# Altium PCB Display-Interface-v1.0.PcbDoc
Units mm, origin at the board's own origin, x right, y up, seen from the top; angles counter-clockwise.
Board outline 31.32 x 29.81 mm, 2 copper layers (Top Layer, Bottom Layer), stack 1.448 mm thick; 18 components, 22 nets, 107 pads, 35 vias.
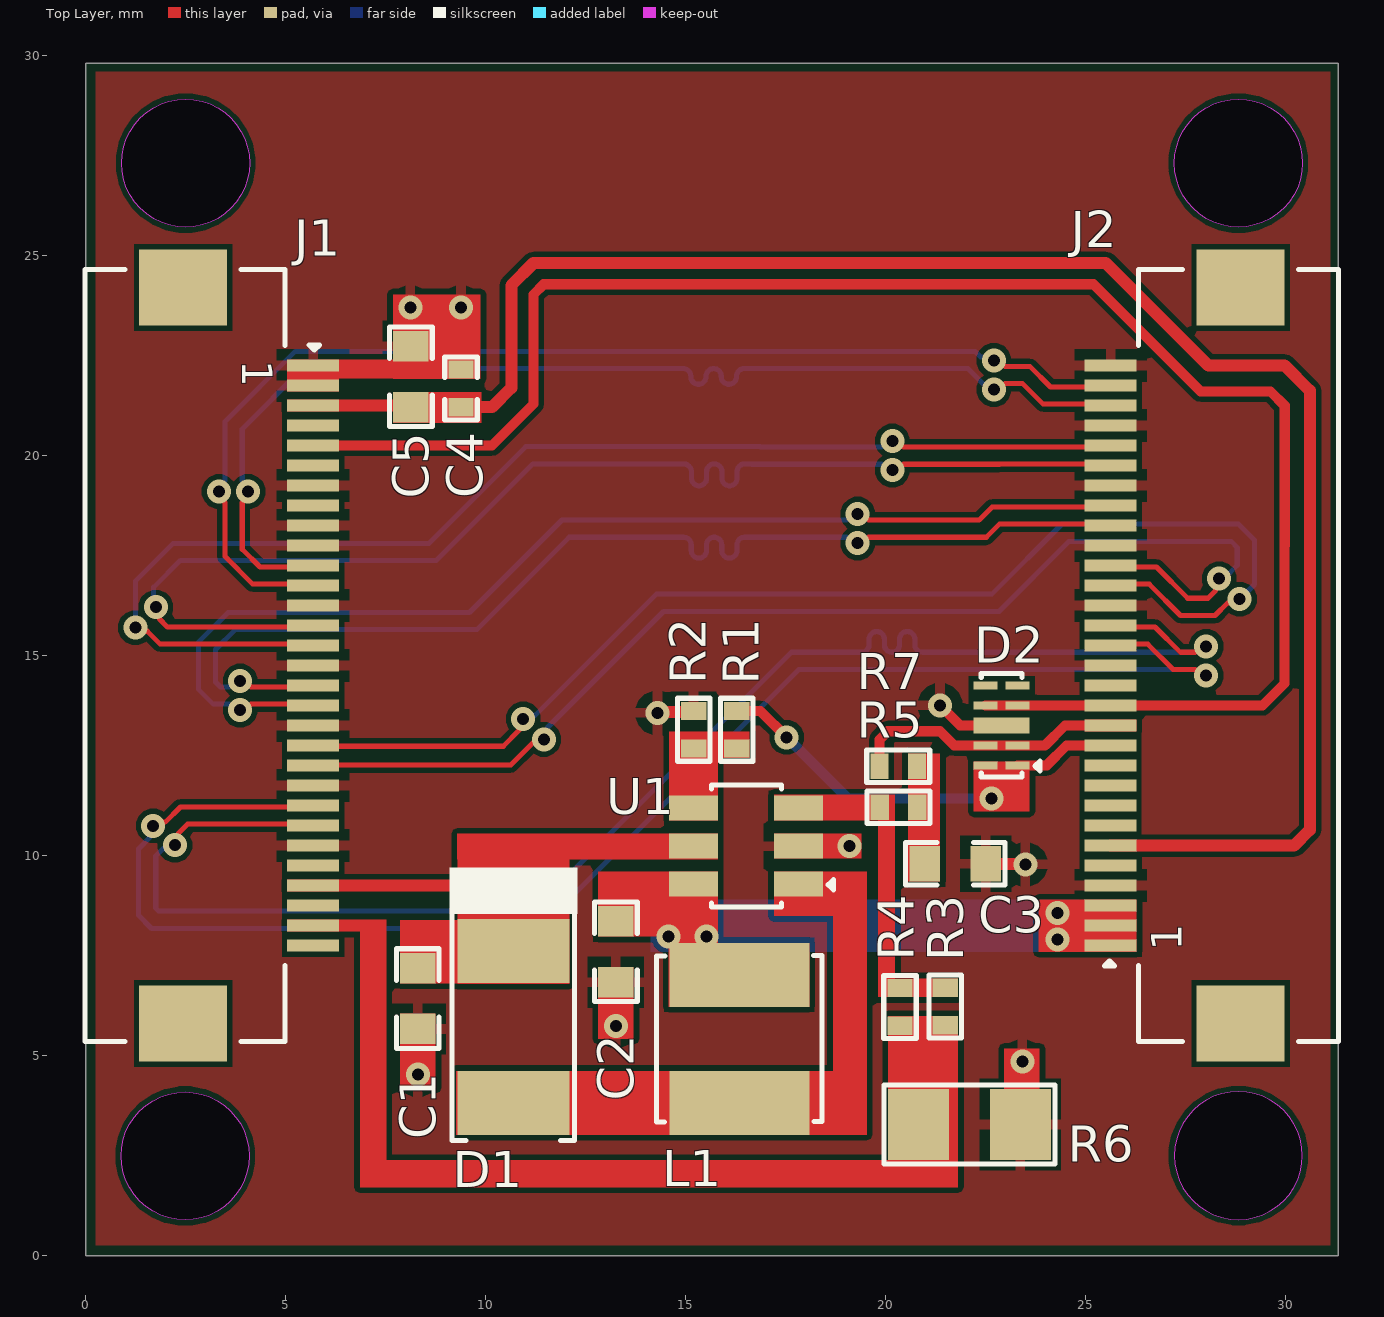
[diagram p0: Top Layer view]
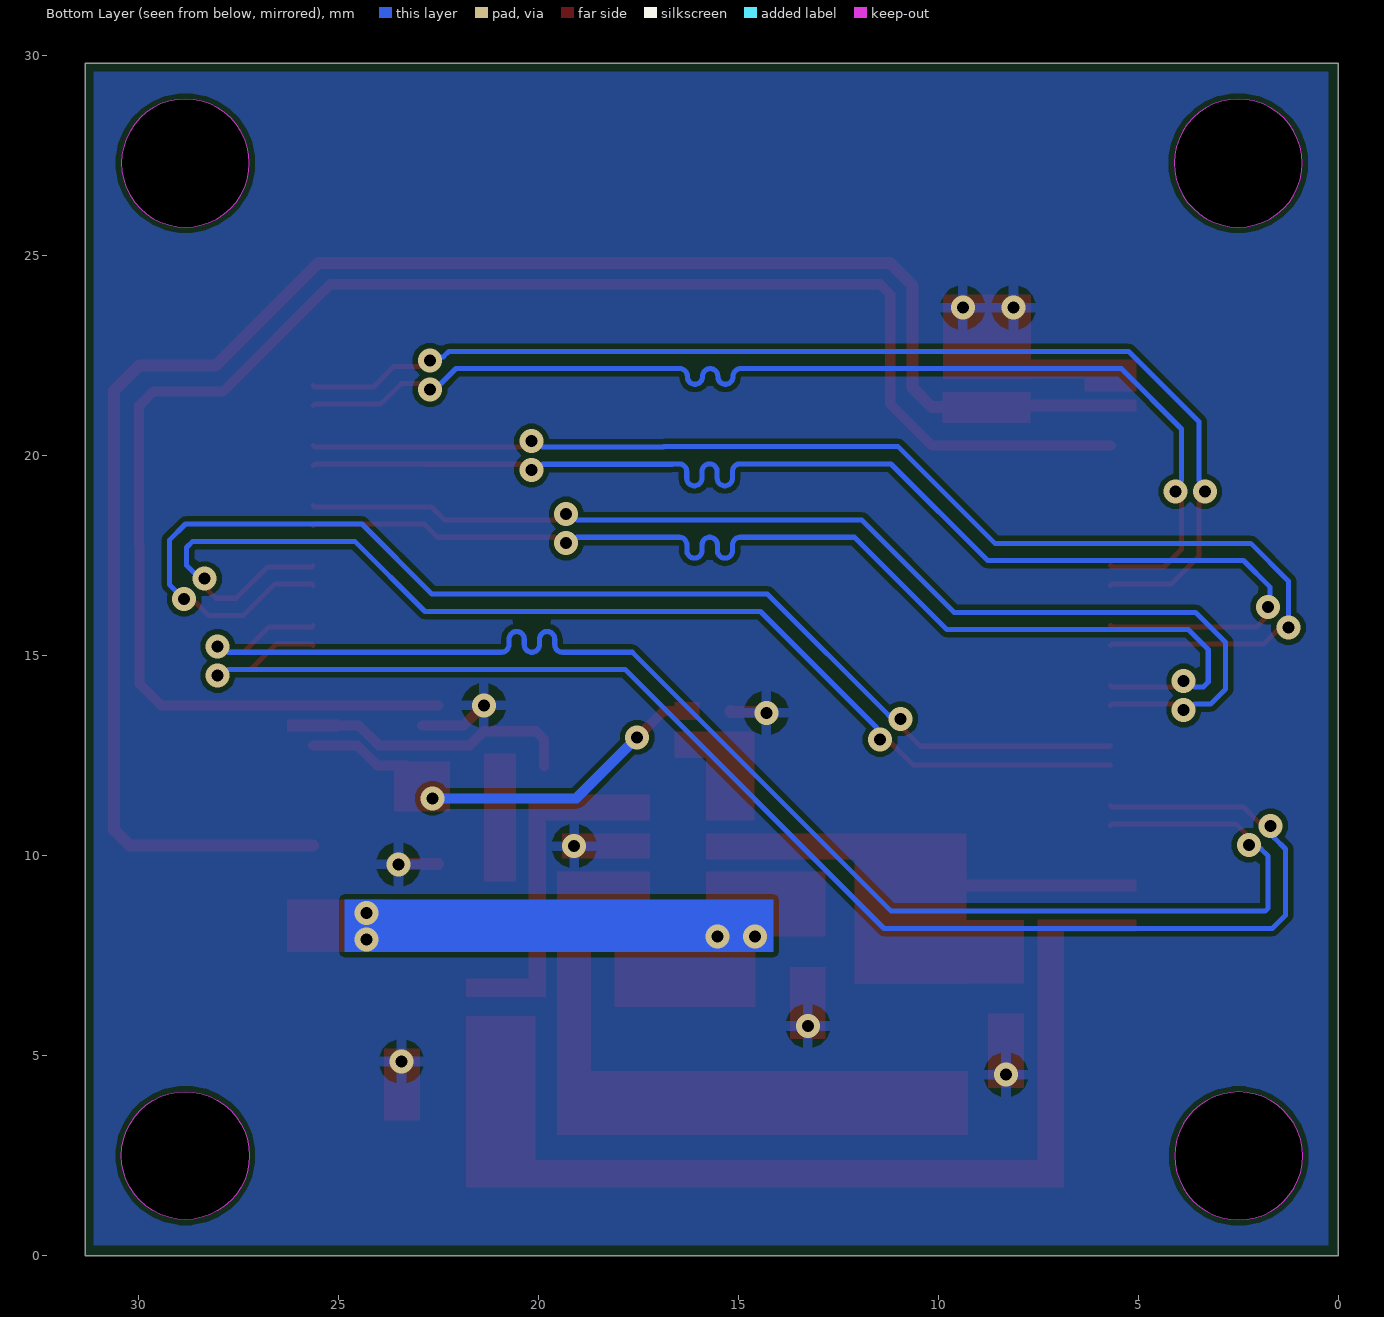
[diagram p1: Bottom Layer view, seen from below]
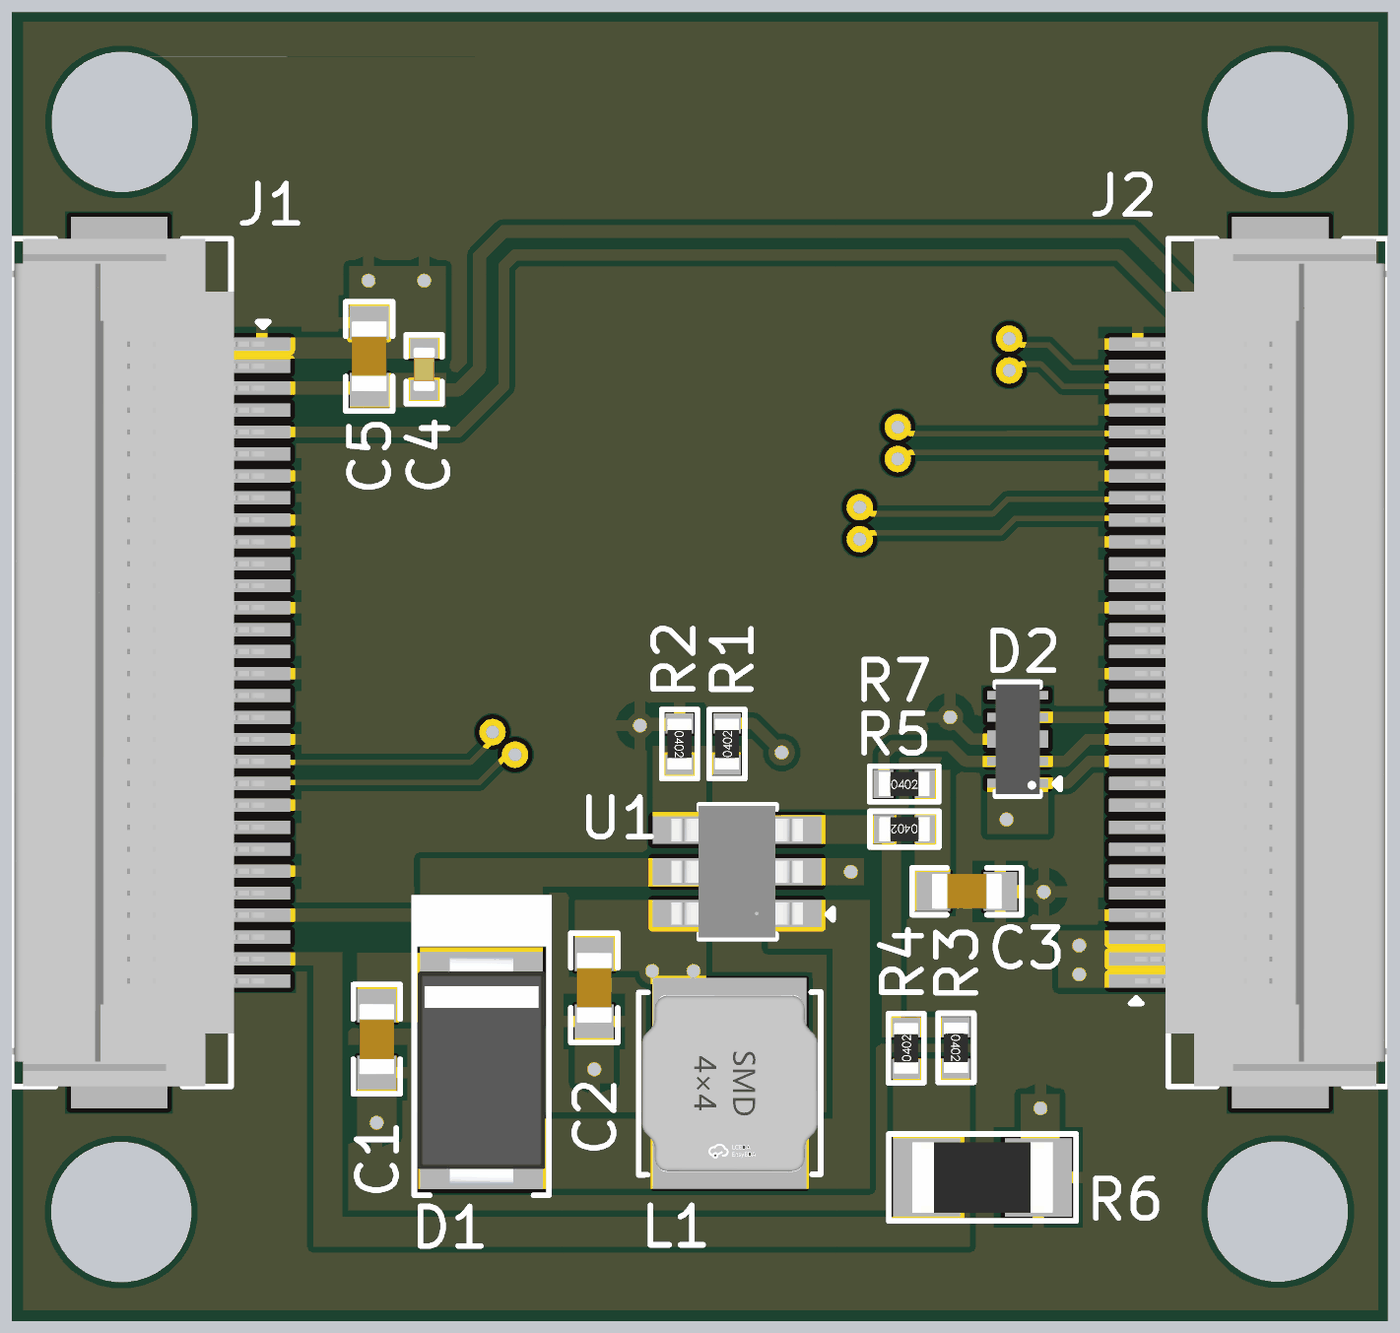
[diagram p2: 3D render of the assembled board from above, using the file's embedded part models]

## Layer stack, top to bottom
Top Solder: solder mask 0.0762, Solder Resist, Dk 3.5
Top Layer: signal copper 0.254
Dielectric 1: dielectric 0.9398, FR-4, Dk 4.8
Bottom Layer: signal copper 0.254
Bottom Solder: solder mask 0.0762, Solder Resist, Dk 3.5

## Board outline
0,0 0,29.811 31.321,29.811 31.321,0
cut-out: 2.5,25.711 cw(c2.5,27.311) 0.9,27.311 cw(c2.5,27.311) 2.5,28.911 cw(c2.5,27.311) 4.1,27.311 cw(c2.5,27.311)
cut-out: 28.821,25.711 cw(c28.821,27.311) 27.221,27.311 cw(c28.821,27.311) 28.821,28.911 cw(c28.821,27.311) 30.421,27.311 cw(c28.821,27.311)
cut-out: 27.221,2.5 ccw(c28.821,2.5) 28.821,0.9 ccw(c28.821,2.5) 30.421,2.5 ccw(c28.821,2.5) 28.821,4.1 ccw(c28.821,2.5)
cut-out: 2.489,0.889 cw(c2.489,2.489) 0.889,2.489 cw(c2.489,2.489) 2.489,4.089 cw(c2.489,2.489) 4.089,2.489 cw(c2.489,2.489)

## Design rules (kind name [scope] priority, off if disabled: settings)
Clearance [All] p1: gap=0.127 ignorepadtopadclearanceinfootprint=FALSE
DiffPairsRouting [InDifferentialPairClass('MIPI_DSI_Lines')] p1: maxlimit=0.305 minlimit=0.305 mostfreqgap=0.305 toplayer_minwidth=0.127 toplayer_maxwidth=0.127 toplayer_prefwidth=0.127 bottomlayer_minwidth=0.127 bottomlayer_maxwidth=0.127 bottomlayer_prefwidth=0.127 impedanceprofiledriven=TRUE impedanceprofileid={C3C8DDCF-617E-46B9-8DE7-2A19607A9E5E} impedanceprofilevalue=100.000000 maxuncoupledlength=12.7
HoleToHoleClearance [All] p1: gap=0.127 allowstackedmicrovias=TRUE
MaxMinImpedance "Schematic Impedance Constraint" [InNetClass('MIPI_DSI')] p1: minimum=98.00 maximum=102.0
MinimumSolderMaskSliver [All] p1: minsoldermaskwidth=0
PolygonConnect [All] p1: connectstyle=Relief reliefconductorwidth=0.254 reliefentries=4 polygonreliefangle="90 Angle" airgapwidth=0.254
RoutingVias [All] p1: holewidth=0.3 width=0.6 viastyle="Through Hole" minholewidth=0.3 minwidth=0.6 maxholewidth=0.3 maxwidth=0.6
SilkToSilkClearance [All] p1: silktosilkclearance=0.127
SilkToSolderMaskClearance [IsPad] p1: minsilkscreentomaskgap=0 clearancetoexposedcopper=TRUE
SolderMaskExpansion [All] p1: expansion=0.102 istentingtop=FALSE
Width [All] p1: maxlimit=0.5 minlimit=0.254 preferedwidth=0.254
25 further rules are at their usual default settings.

## Classes and differential pairs
differential pair class MIPI_DSI_Lines: MIPI_DSI_TX0_CLK MIPI_DSI_TX0_D0 MIPI_DSI_TX0_D1 MIPI_DSI_TX0_D2 MIPI_DSI_TX0_D3
net class MIPI_DSI: MIPI_DSI_TX0_CLK_N MIPI_DSI_TX0_CLK_P MIPI_DSI_TX0_D0_N MIPI_DSI_TX0_D0_P MIPI_DSI_TX0_D1_N MIPI_DSI_TX0_D1_P MIPI_DSI_TX0_D2_N MIPI_DSI_TX0_D2_P MIPI_DSI_TX0_D3_N MIPI_DSI_TX0_D3_P
differential pair MIPI_DSI_TX0_D3: +MIPI_DSI_TX0_D3_P -MIPI_DSI_TX0_D3_N
differential pair MIPI_DSI_TX0_D2: +MIPI_DSI_TX0_D2_P -MIPI_DSI_TX0_D2_N
differential pair MIPI_DSI_TX0_D1: +MIPI_DSI_TX0_D1_P -MIPI_DSI_TX0_D1_N
differential pair MIPI_DSI_TX0_D0: +MIPI_DSI_TX0_D0_P -MIPI_DSI_TX0_D0_N
differential pair MIPI_DSI_TX0_CLK: +MIPI_DSI_TX0_CLK_P -MIPI_DSI_TX0_CLK_N

## Components (designator, comment, footprint, x,y, rotation, side; value= is the part's Value field where it differs from the comment)
C1 "1uF" Cap-0603 8.306,6.426 r90 top
C2 "2.2uF" CAP-0603 13.259,7.595 r90 top
C3 "1uF" Cap-0603 21.742,9.792 r180 top
C4 "0.1uF" Cap-0402 9.385,21.679 r270 top
C5 "10uF" Cap-0603 8.133,21.974 r270 top
D1 "SS26" SMA(DO-214AC) 10.693,5.715 r270 top
D2 "ESD5304D-10/TR" DFN2510-10L_ 23.3,12.255 r180 top
J1 "TF31-30S-0.5SH(800)" TF31-30S-0.5SH(800) 4.064,15 r270 top locked
J2 "TF31-30S-0.5SH(800)" TF31-30S-0.5SH(800) 27.254,15 r90 top locked
L1 "22uH" YNR4018-220M 16.343,5.418 r270 top
R1 "0R" Res-0402 16.281,13.144 r90 top
R2 "10K" Res-0402 15.2,13.144 r270 top
R3 "DNP" Res-0402 21.494,6.229 r270 top
R4 "10K" Res-0402 20.36,6.218 r90 top
R5 "3K" Res-0402 20.322,11.207 r180 top value=3kR
R6 "8.2R" Res-1206 22.098,3.277 r180 top
R7 "82K" Res-0402 20.317,12.236 r0 top value=82kR
U1 "RT9293BGJ6" SOT-23-6 16.51,10.236 r180 top

## Footprints (in the part's own frame and the unit in brackets; to place one, negate y for a bottom-side part, rotate by r counter-clockwise, add the part's x,y. Pads: shape width x height; smd on the part's side, far side on the other; paste and mask are expansions set on the pad)
Cap-0402 [mil]
  rect 18x25 smd mask+2.36: 1(-18.5,0) 2(18.5,0)
  silkscreen extent -31,-16 31,16, body extent -20,-10 20,10, height 19
Cap-0603 [mil]
  rect 30x35 smd mask+2.36: 1(-30,0) 2(30,0)
  silkscreen extent -49,-21 49,21, body extent -32,-16 31,16, height 34
CAP-0603 [mil]
  rect 30x35 smd mask+2.36: 1(-30,0) 2(30,0)
  silkscreen extent -49,-21 49,21, body extent -32,-16 31,16, height 34
DFN2510-10L_ [mm]
  rect 0.6x0.2 smd: 1(0,0) 2(0,-0.5) 4(0,-1.5) 5(0,-2) 6(0.8,-2) 7(0.8,-1.5) 9(0.8,-0.5) 10(0.8,0)
  rect 1.4x0.4 smd: 3_8(0.4,-1)
  silkscreen extent -0.57,-2.3 0.91,0.3, body extent -0.1,-2.25 0.9,0.25, height 0.55
Res-0402 [mil]
  rect 18x25 smd mask+2.17: 1(-18.5,0) 2(18.5,0)
  silkscreen extent -32,-17 32,16, body extent -23,-11 23,11, height 16
Res-1206 [mil]
  rect 60x70 smd: 1(-50,0) 2(50,0)
  silkscreen extent -84,-39 84,39, body extent -63,-31 63,31, height 24
SMA(DO-214AC) [mm]
  rect 1.6x2.8 smd: 1(-1.9,0) 2(1.9,0)
  silkscreen extent -3.99,-1.6 2.84,1.6, body extent -2.6,-1.45 2.6,1.45, height 2.3
SOT-23-6 [mm]
  rect 1.22x0.62 smd: 1(-1.31,0.95) 2(-1.31,0) 3(-1.31,-0.95) 4(1.31,-0.95) 5(1.31,0) 6(1.31,0.95)
  silkscreen extent -2.18,-1.52 0.86,1.52, body extent -1.5,-1.5 1.5,1.5, height 1.47
TF31-30S-0.5SH(800) [mm]
  rect 0.3x1.3 smd: 1(-7.25,1.625) 2(-6.75,1.625) 3(-6.25,1.625) 4(-5.75,1.625) 5(-5.25,1.625) 6(-4.75,1.625) 7(-4.25,1.625) 8(-3.75,1.625) 9(-3.25,1.625) 10(-2.75,1.625) 11(-2.25,1.625) 12(-1.75,1.625) 13(-1.25,1.625) 14(-0.75,1.625) 15(-0.25,1.625) 16(0.25,1.625) 17(0.75,1.625) 18(1.25,1.625) 19(1.75,1.625) 20(2.25,1.625) 21(2.75,1.625) 22(3.25,1.625) 23(3.75,1.625) 24(4.25,1.625) 25(4.75,1.625) 26(5.25,1.625) 27(5.75,1.625) 28(6.25,1.625) 29(6.75,1.625) 30(7.25,1.625)
  rect 1.9x2.2 smd: S1(9.2,-1.625) S2(-9.2,-1.625)
  silkscreen extent -9.65,-4.08 9.65,1.78, body extent -9.65,-4.06 9.65,1.69, height 2.02
YNR4018-220M [mm]
  rect 1.6x3.5 smd paste+0 mask+0.051: 1(-1.6,0) 2(1.6,0)
  silkscreen extent -2.08,-2.07 2.08,2.07, body extent -2.01,-2 2.01,2, height 1.87

## Part data
C1 C3: library part CL10A105KB8NNNC, "CAP CER 1UF 50V X5R 0603", Case Code (Imperial)=0603, Case Code (Metric)=1608, Dielectric=X5R, LCSC Part Number=C15849, Manufacturer=Samsung, Max Operating Temperature=85°C, Min Operating Temperature=-55°C, Tolerance=10%, Voltage Rating=50V, Case/Package=0603, Category="Ceramic Capacitors", ComponentLink1Description=https://datasheet.ciiva.com/26877/getdatasheetpartid-753736-26877879.pdf?src-supplier=Verical, ComponentLink1URL=https://datasheet.ciiva.com/26877/getdatasheetpartid-753736-26877879.pdf?src-supplier=Verical, Depth=0.8mm, Item Type=Capacitor, Length=1.6mm, Manufacturer Part Number=CL10A105KB8NNNC, Material=4241ConductorMaterial, Mounting Technology="Surface Mount", Packaging="Tape and Reel", Pricing="4000=0.01632, 8000=0.01595, 16000=0.01557, 24000=0.0152, 32000=0.01482 (USD)", Radiation Hardening=No, RoHS=Yes, RoHS Compliant=Yes, Series=CL, Stock=780446, Supplier=Avnet, Supplier Part Number=CL10A105KB8NNNC, Voltage Rating (DC)=50V
C2: library part CC0603KRX5R8BB225, "CAP CER 2.2UF 25V X5R 0603", Case Code (Imperial)=0603, Case Code (Metric)=1608, Dielectric=X5R, LCSC Part Number=C309478, Manufacturer=Yageo, Max Operating Temperature=85°C, Min Operating Temperature=-55°C, Package Quantity=4000, Resistor Type=Ceramic, Supplier Part Number 1=311-1786-1-ND, Tolerance=10%, Voltage Rating=25V, Capacitance=2.2uF, Case/Package=0603, ComponentLink1Description=https://www.verical.com/server-webapp/html/getDatasheet?partID=782757&src-supplier=Verical, ComponentLink1URL=https://www.verical.com/server-webapp/html/getDatasheet?partID=782757&src-supplier=Verical, Depth=0.8mm, Halogen Free="Halogen Free", Item Type=Capacitor, Lead Free="Lead Free", Length=1.6mm, Manufacturer Part Number=CC0603KRX5R8BB225, Mount="Surface Mount", Packaging="Tape and Reel", Pricing 1="1=0.4, 10=0.276, 50=0.1932, 100=0.1656, 500=0.1242, 1000=0.10488 (USD)", Radiation Hardening=No, RoHS Compliant=Yes, Stock 1=687936, Supplier 1=Digi-Key, Termination=SMD/SMT, Thickness=0.037inch, Voltage Rating (DC)=25V, Weight=7.1E-05oz, Width=0.031inch
C4: library part CC0402KRX5R6BB104, "CAP CER 0.1UF 10V X5R 0402", Capacitance=100nF, Case Code (Imperial)=0402, Case Code (Metric)=1005, Dielectric=X5R, Insulation Resistance=10GR, LCSC Part Number=C129131, Manufacturer=Yageo, Max Operating Temperature=85°C, Min Operating Temperature=-55°C, Package Quantity=1, Supplier Part Number 1=311-1336-1-ND, Tolerance=10%, Voltage Rating=10V, Case/Package=0402, Category="Ceramic Capacitors", ComponentLink1Description=https://datasheet.ciiva.com/144/mlccorderingcode-144029.pdf?src-supplier=Digi-Key, ComponentLink1URL=https://datasheet.ciiva.com/144/mlccorderingcode-144029.pdf?src-supplier=Digi-Key, ComponentLink2Description=https://datasheet.ciiva.com/144/mlccorderingcode-144028.pdf?src-supplier=Digi-Key, ComponentLink2URL=https://datasheet.ciiva.com/144/mlccorderingcode-144028.pdf?src-supplier=Digi-Key, ComponentLink3Description=https://datasheet.ciiva.com/144/mlccorderingcode-144030.pdf?src-supplier=Digi-Key, ComponentLink3URL=https://datasheet.ciiva.com/144/mlccorderingcode-144030.pdf?src-supplier=Digi-Key, ComponentLink4Description=https://datasheet.ciiva.com/7978/1359354-7978091.pdf?src-supplier=Element14, ComponentLink4URL=https://datasheet.ciiva.com/7978/1359354-7978091.pdf?src-supplier=Element14, ComponentLink5Description=https://datasheet.ciiva.com/11587/upy-gphc-x5r-4v-to-50v-12-11587302.pdf?src-supplier=Avnet, ComponentLink5URL=https://datasheet.ciiva.com/11587/upy-gphc-x5r-4v-to-50v-12-11587302.pdf?src-supplier=Avnet, Depth=0.5mm, Dissipation Factor=5%, Halogen Free="Halogen Free", Height=0.5mm, Item Type=Capacitor, Lead Free="Lead Free", Length=1mm, Manufacturer Part Number=CC0402KRX5R6BB104, Mount="Surface Mount", Number of Pins=2, Packaging="Tape and Reel", Pricing 1="1=0.10000, 10=0.02700, 50=0.01500, 100=0.01220, 500=0.00874, 1000=0.00687, 2500=0.00625, 5000=0.00575 (USD)", Radiation Hardening=No, REACH SVHC="No SVHC", RoHS=Yes, RoHS Compliant=Yes, Series=CC, Stock 1=6385580, Supplier 1=Digi-Key, Termination=SMD/SMT, Thickness=0.022inch, Voltage Rating (DC)=10V, Width=0.02inch
C5: library part GRM188R60J106ME47D, "CAP CER 10UF 6.3V X5R 0603", Case Code (Imperial)=0603, Case Code (Metric)=1608, Dielectric=X5R, LCSC Part Number=C77041, Manufacturer=Murata, Max Operating Temperature=85°C, Min Operating Temperature=-55°C, Package Quantity=4000, Tolerance=20%, Voltage=6.3V, Capacitance=10uF, Case/Package=0603, Category="Ceramic Capacitors", ComponentLink1Description=https://datasheet.ciiva.com/22776/1747457-22776418.pdf?src-supplier=Farnell, ComponentLink1URL=https://datasheet.ciiva.com/22776/1747457-22776418.pdf?src-supplier=Farnell, ComponentLink2Description=https://datasheet.ciiva.com/28584/415295-28584232.pdf?src-supplier=Element14, ComponentLink2URL=https://datasheet.ciiva.com/28584/415295-28584232.pdf?src-supplier=Element14, ComponentLink3Description=https://datasheet.ciiva.com/3777/10175grm188r60j106me4723-3777268.pdf?src-supplier=Arrow+Electronics, ComponentLink3URL=https://datasheet.ciiva.com/3777/10175grm188r60j106me4723-3777268.pdf?src-supplier=Arrow+Electronics, ComponentLink4Description=https://datasheet.ciiva.com/29202/450781-da-01-de-vs-chip-kond-0603-10-0-uf-20pr-6-3v-x5r-29202806.pdf?src-supplier=Conrad, ComponentLink4URL=https://datasheet.ciiva.com/29202/450781-da-01-de-vs-chip-kond-0603-10-0-uf-20pr-6-3v-x5r-29202806.pdf?src-supplier=Conrad, ComponentLink5Description=https://datasheet.ciiva.com/29199/454401-da-01-en-vs-kondensator-0603-29199677.pdf?src-supplier=Conrad, ComponentLink5URL=https://datasheet.ciiva.com/29199/454401-da-01-en-vs-kondensator-0603-29199677.pdf?src-supplier=Conrad, ComponentLink6Description=https://datasheet.ciiva.com/14116/grmseries-highdielectrictype-eng-14116428.pdf?src-supplier=Distrelec, ComponentLink6URL=https://datasheet.ciiva.com/14116/grmseries-highdielectrictype-eng-14116428.pdf?src-supplier=Distrelec, ComponentLink7Description=https://datasheet.ciiva.com/138/partnumbering-e-01-138659.pdf?src-supplier=Digi-Key, ComponentLink7URL=https://datasheet.ciiva.com/138/partnumbering-e-01-138659.pdf?src-supplier=Digi-Key, ComponentLink8Description=https://datasheet.ciiva.com/138/partnumbering-e-01-138658.pdf?src-supplier=Digi-Key, ComponentLink8URL=https://datasheet.ciiva.com/138/partnumbering-e-01-138658.pdf?src-supplier=Digi-Key, ComponentLink9Description=https://datasheet.ciiva.com/138/partnumbering-e-01-138660.pdf?src-supplier=Digi-Key, ComponentLink9URL=https://datasheet.ciiva.com/138/partnumbering-e-01-138660.pdf?src-supplier=Digi-Key, ComponentLink10Description=https://datasheet.ciiva.com/16373/l0005e-16373580.pdf?src-supplier=Future+Electronics, ComponentLink10URL=https://datasheet.ciiva.com/16373/l0005e-16373580.pdf?src-supplier=Future+Electronics, Depth=0.8mm, Height=0.8mm, Item Type=Capacitor, Lead Free="Lead Free", Length=1.6mm, Manufacturer Part Number=GRM188R60J106ME47D, Material=Ceramic, Mount="Surface Mount", Packaging="Cut Tape", Pricing 1="4000=0.02461, 8000=0.02328, 16000=0.02195, 24000=0.02062, 32000=0.01929, 40000=0.01796, 400000=0.01663 (USD)", Radiation Hardening=No, Reach SVHC Compliant=Yes, RoHS=Yes, RoHS Compliant=Yes, Series=GRM, Stock 1=513625, Supplier 1=Avnet, Supplier Part Number 1=GRM188R60J106ME47D, Termination=Standard, Thickness=0.035inch, Voltage Rating=6.3V, Voltage Rating (DC)=6.3V, Weight=0.000222oz, Width=0.8mm
D1: "60V 700mV@2A 2A SMA(DO-214AC) Schottky Barrier Diodes (SBD) ROHS", LCSC Part Number=C14238, Manufacturer=MDD, Package=SMA(DO-214AC), ComponentLink1Description=LCSC, ComponentLink1URL=https://www.lcsc.com/product-detail/Schottky-Barrier-Diodes-SBD_MDD-Microdiode-Electronics-SS26_C14238.html, Item Type=Diode, Manufacturer Part Number=SS26
D2: "4A@8/20us 12V 7V 5V Unidirectional DFN2510-10L TVS ROHS", LCSC Part Number=C153722, Manufacturer=WILLSEMI, Package=DFN2510-10L, ComponentLink1Description=LCSC, ComponentLink1URL=https://www.lcsc.com/product-detail/TVS_WILLSEMI-Will-Semicon-ESD5304D-10-TR_C153722.html, Item Type=Diode, Manufacturer Part Number=ESD5304D-10/TR
J1 J2: "CONN FFC BOTTOM 30POS 0.5MM R/A", LCSC Part Number=C5137133, Manufacturer=Hirose, Supplier Part Number=26-TF31-30S-0.5SH(800)CT-ND, ComponentLink1Description=https://www.hirose.com/product/download/?distributor=digikey&amp;type=specSheet&amp;lang=en&amp;num=TF31-30S-0.5SH(800)&src-supplier=Digikey, ComponentLink1URL=https://www.hirose.com/product/download/?distributor=digikey&amp;type=specSheet&amp;lang=en&amp;num=TF31-30S-0.5SH(800)&src-supplier=Digikey, ComponentLink2Description=https://datasheet.octopart.com/TF31-30S-0.5SH%28800%29-Hirose-datasheet-138123803.pdf?src-supplier=Sager+Electronics, ComponentLink2URL=https://datasheet.octopart.com/TF31-30S-0.5SH%28800%29-Hirose-datasheet-138123803.pdf?src-supplier=Sager+Electronics, Item Type="FFC / FPC Connector", Manufacturer Part Number=TF31-30S-0.5SH(800), Pricing="1=2.37, 10=2.065, 25=1.9772, 50=1.9332, 100=1.8453, 250=1.66952, 500=1.53772, 1000=1.31805 (USD)", RoHS=Yes, Stock=14095, Supplier=Digikey
L1: library part YNR4018-220M, "590mA 22uH ±20% SMD,4x4x1.8mm Power Inductors ROHS", LCSC Part Number=C340373, Manufacturer=YJYCOIN, Package=SMD,4x4x1.8mm, ComponentLink1Description=LCSC, ComponentLink1URL=https://www.lcsc.com/product-detail/Power-Inductors_YJYCOIN-YNR4018-220M_C340373.html, Item Type=Inductor, Manufacturer Part Number=YNR4018-220M
R1: library part RC0402FR-070RL, "RES 0 OHM JUMPER 1/16W 0402", Case Code (Imperial)=0402, Case Code (Metric)=1005, LCSC Part Number=C106231, Manufacturer=Yageo, Max Operating Temperature=155°C, Max Power Dissipation=63mW, Min Operating Temperature=-55°C, Power Rating=62.5mW, Resistor Type="Thick Film", Supplier Part Number 1=603-RC0402FR-070RL, Temperature Coefficient=200ppm/°C, Tolerance=1%, Voltage Rating=50V, Case/Package=0402, Category="Chip SMD Resistors", ComponentLink1Description=https://datasheet.ciiva.com/8896/pyu-rc0402-51-rohs-l-6-8896149.pdf?src-supplier=Avnet, ComponentLink1URL=https://datasheet.ciiva.com/8896/pyu-rc0402-51-rohs-l-6-8896149.pdf?src-supplier=Avnet, ComponentLink2Description=https://datasheet.ciiva.com/16790/pyu-rc0402-51-rohs-l-6-r-16790444.pdf?src-supplier=Future+Electronics, ComponentLink2URL=https://datasheet.ciiva.com/16790/pyu-rc0402-51-rohs-l-6-r-16790444.pdf?src-supplier=Future+Electronics, Contact Plating=Tin,Matte, Features="Moisture Resistant", Height=0.35mm, Lead Free="Lead Free", Length=1mm, Manufacturer Part Number=RC0402FR-070RL, Mount="Surface Mount", Number of Terminations=2, Packaging="Tape and Reel", Pricing 1="1=0.10000, 10=0.01400, 50=0.01400, 100=0.00600, 1000=0.00300, 5000=0.00200, 10000=0.00100 (USD)", Radiation Hardening=No, Resistance=0R, RoHS=Yes, RoHS Compliant=Yes, Series=RC, Size Code=0402, Stock 1=8556842, Supplier 1=Mouser, Termination=SMD/SMT, Width=0.5mm
R2 R4: library part RC0402FR-0710KL, "RES 10K OHM 1% 1/16W 0402", Case Code (Imperial)=0402, Case Code (Metric)=1005, LCSC Part Number=C60490, Manufacturer=Yageo, Max Operating Temperature=155°C, Max Power Dissipation=63mW, Min Operating Temperature=-55°C, Power Rating=62.5mW, Resistance=10kR, Resistance Tolerance=1%, Resistor Type="Thick Film", Supplier Part Number 1=603-RC0402FR-0710KL, Temperature Coefficient=100ppm/°C, Voltage Rating=50V, Case/Package=0402, Category="Chip SMD Resistors", ComponentLink1Description=https://datasheet.ciiva.com/7660/38568-7660787.pdf?src-supplier=Element14, ComponentLink1URL=https://datasheet.ciiva.com/7660/38568-7660787.pdf?src-supplier=Element14, ComponentLink2Description=https://datasheet.ciiva.com/7849/1686128-7849814.pdf?src-supplier=Element14, ComponentLink2URL=https://datasheet.ciiva.com/7849/1686128-7849814.pdf?src-supplier=Element14, ComponentLink3Description=https://datasheet.ciiva.com/7983/1018594-7983486.pdf?src-supplier=Element14, ComponentLink3URL=https://datasheet.ciiva.com/7983/1018594-7983486.pdf?src-supplier=Element14, ComponentLink4Description=https://datasheet.ciiva.com/22747/1018594-22747512.pdf?src-supplier=Element14, ComponentLink4URL=https://datasheet.ciiva.com/22747/1018594-22747512.pdf?src-supplier=Element14, ComponentLink5Description=https://datasheet.ciiva.com/12667/pyu-rc0402-51-rohs-l-6-r-12667067.pdf?src-supplier=Mouser, ComponentLink5URL=https://datasheet.ciiva.com/12667/pyu-rc0402-51-rohs-l-6-r-12667067.pdf?src-supplier=Mouser, ComponentLink6Description=https://datasheet.ciiva.com/7849/1784430-7849813.pdf?src-supplier=Element14, ComponentLink6URL=https://datasheet.ciiva.com/7849/1784430-7849813.pdf?src-supplier=Element14, ComponentLink7Description=https://datasheet.ciiva.com/7849/1784430-7849815.pdf?src-supplier=Element14, ComponentLink7URL=https://datasheet.ciiva.com/7849/1784430-7849815.pdf?src-supplier=Element14, Construction=Rectangular, Depth=0.5mm, Features="Moisture Resistant", Height=0.32mm, Item Type=Resistor, Lead Free="Lead Free", Lead Pitch=0.2mm, Length=1mm, Manufacturer Part Number=RC0402FR-0710KL, Military Standard=Not, Number of Pins=2, Number of Terminations=2, Packaging="Tape and Reel", Pricing 1="1=0.10000, 10=0.01400, 50=0.01400, 100=0.00500, 1000=0.00300, 10000=0.00200 (USD)", REACH SVHC="No SVHC", RoHS=Yes, RoHS Compliant=Yes, Series=RC, Stock 1=18648329, Supplier 1=Mouser, Termination=SMD/SMT, Tolerance=1%, Voltage Rating (DC)=50V, Width=0.5mm, Working Voltage=50V
R3: library part RC0402FR-070RL, "RES 0 OHM JUMPER 1/16W 0402", Case Code (Imperial)=0402, Case Code (Metric)=1005, LCSC Part Number=C106231, Manufacturer=Yageo, Max Operating Temperature=155°C, Max Power Dissipation=63mW, Min Operating Temperature=-55°C, Power Rating=62.5mW, Resistance=0R, Resistor Type="Thick Film", Supplier Part Number 1=603-RC0402FR-070RL, Temperature Coefficient=200ppm/°C, Tolerance=1%, Voltage Rating=50V, Case/Package=0402, Category="Chip SMD Resistors", ComponentLink1Description=https://datasheet.ciiva.com/8896/pyu-rc0402-51-rohs-l-6-8896149.pdf?src-supplier=Avnet, ComponentLink1URL=https://datasheet.ciiva.com/8896/pyu-rc0402-51-rohs-l-6-8896149.pdf?src-supplier=Avnet, ComponentLink2Description=https://datasheet.ciiva.com/16790/pyu-rc0402-51-rohs-l-6-r-16790444.pdf?src-supplier=Future+Electronics, ComponentLink2URL=https://datasheet.ciiva.com/16790/pyu-rc0402-51-rohs-l-6-r-16790444.pdf?src-supplier=Future+Electronics, Contact Plating=Tin,Matte, Features="Moisture Resistant", Height=0.35mm, Lead Free="Lead Free", Length=1mm, Manufacturer Part Number=RC0402FR-070RL, Mount="Surface Mount", Number of Terminations=2, Packaging="Tape and Reel", Pricing 1="1=0.10000, 10=0.01400, 50=0.01400, 100=0.00600, 1000=0.00300, 5000=0.00200, 10000=0.00100 (USD)", Radiation Hardening=No, RoHS=Yes, RoHS Compliant=Yes, Series=RC, Size Code=0402, Stock 1=8556842, Supplier 1=Mouser, Termination=SMD/SMT, Width=0.5mm
R5: library part RC0402FR-073KL, "RES 3K OHM 1% 1/16W 0402", Case Code (Imperial)=0402, Case Code (Metric)=1005, LCSC Part Number=C137987, Manufacturer=Yageo, Max Operating Temperature=155°C, Max Power Dissipation=63mW, Min Operating Temperature=-55°C, Package Quantity=1, Resistance Tolerance=1%, Resistor Type="Thick Film", Supplier Part Number=311-3KLRCT-ND, Temperature Coefficient=100ppm/°C, Voltage Rating=50V, Case/Package=0402, Category="Chip SMD Resistors", ComponentLink1Description=https://datasheet.ciiva.com/2553/pyu-r-int-thick-7-2553254.pdf?src-supplier=Digikey, ComponentLink1URL=https://datasheet.ciiva.com/2553/pyu-r-int-thick-7-2553254.pdf?src-supplier=Digikey, ComponentLink2Description=https://datasheet.ciiva.com/7849/1018594-7849992.pdf?src-supplier=Element14, ComponentLink2URL=https://datasheet.ciiva.com/7849/1018594-7849992.pdf?src-supplier=Element14, ComponentLink3Description=https://datasheet.ciiva.com/7849/1018594-7849991.pdf?src-supplier=Element14, ComponentLink3URL=https://datasheet.ciiva.com/7849/1018594-7849991.pdf?src-supplier=Element14, ComponentLink4Description=https://datasheet.ciiva.com/2553/pyu-r-int-thick-7-2553255.pdf?src-supplier=Digikey, ComponentLink4URL=https://datasheet.ciiva.com/2553/pyu-r-int-thick-7-2553255.pdf?src-supplier=Digikey, ComponentLink5Description=https://datasheet.ciiva.com/2553/pyu-r-int-thick-7-2553256.pdf?src-supplier=Digikey, ComponentLink5URL=https://datasheet.ciiva.com/2553/pyu-r-int-thick-7-2553256.pdf?src-supplier=Digikey, ComponentLink6Description=https://datasheet.ciiva.com/12666/pyu-rc0402-51-rohs-l-6-r-12666952.pdf?src-supplier=Mouser, ComponentLink6URL=https://datasheet.ciiva.com/12666/pyu-rc0402-51-rohs-l-6-r-12666952.pdf?src-supplier=Mouser, Construction=Rectangular, Depth=0.5mm, Features="Moisture Resistant", Height=0.016inch, Item Type=Resistor, Lead Free=5697LeadFree, Length=0.039inch, Manufacturer Part Number=RC0402FR-073KL, Military Standard=Not, Number of Terminations=2, Packaging="Tape and Reel", Power Rating=63mW, Pricing="1=0.1, 10=0.015, 50=0.0088, 100=0.0073, 500=0.00488, 1000=0.00417, 5000=0.00297 (USD)", Reach SVHC Compliant=Unknown, RoHS=Yes, RoHS Compliant=Yes, Series=RC, Stock=7013, Supplier=Digikey, Termination=SMD/SMT, Tolerance=1%, Voltage Rating (DC)=50V, Width=0.02inch
R6: library part RC1206FR-078R2L, "RES 8.2 OHM 1% 1/4W 1206", LCSC Part Number=C488973, Manufacturer=Yageo, Supplier Part Number=311-8.20FRCT-ND, Voltage Rating (AC)=200V, ComponentLink1Description=https://datasheet.ciiva.com/11809/0900766b80c6630a-11809543.pdf?src-supplier=Rs, ComponentLink1URL=https://datasheet.ciiva.com/11809/0900766b80c6630a-11809543.pdf?src-supplier=Rs, ComponentLink2Description=https://datasheet.ciiva.com/2460/pyu-rc1206-51-rohs-l-4-2460129.pdf?src-supplier=Digikey, ComponentLink2URL=https://datasheet.ciiva.com/2460/pyu-rc1206-51-rohs-l-4-2460129.pdf?src-supplier=Digikey, ComponentLink3Description=https://datasheet.ciiva.com/2460/pyu-rc1206-51-rohs-l-4-2460130.pdf?src-supplier=Digikey, ComponentLink3URL=https://datasheet.ciiva.com/2460/pyu-rc1206-51-rohs-l-4-2460130.pdf?src-supplier=Digikey, ComponentLink4Description=https://datasheet.ciiva.com/2460/pyu-rc1206-51-rohs-l-4-2460131.pdf?src-supplier=Digikey, ComponentLink4URL=https://datasheet.ciiva.com/2460/pyu-rc1206-51-rohs-l-4-2460131.pdf?src-supplier=Digikey, Item Type=Resistors, Manufacturer Part Number=RC1206FR-078R2L, Pricing="1=0.13, 10=0.064, 50=0.0426, 100=0.0364, 500=0.02612, 1000=0.023 (USD)", RoHS=Yes, Stock=39560, Supplier=Digikey
R7: library part RC0402FR-0782KL, "RES 82K OHM 1% 1/16W 0402", Case Code (Imperial)=0402, Case Code (Metric)=1005, LCSC Part Number=C137932, Manufacturer=Yageo, Max Operating Temperature=155°C, Max Power Dissipation=63mW, Min Operating Temperature=-55°C, Package Quantity=1, Resistance Tolerance=1%, Resistor Type="Thick Film", Supplier Part Number=311-82.0KLRCT-ND, Temperature Coefficient=100ppm/°C, Voltage Rating=50V, Case/Package=0402, Category="Chip SMD Resistors", ComponentLink1Description=https://datasheet.ciiva.com/11808/0900766b80c66297-11808835.pdf?src-supplier=Rs, ComponentLink1URL=https://datasheet.ciiva.com/11808/0900766b80c66297-11808835.pdf?src-supplier=Rs, ComponentLink2Description=https://datasheet.ciiva.com/2491/pyu-r-int-thick-7-2491346.pdf?src-supplier=Digikey, ComponentLink2URL=https://datasheet.ciiva.com/2491/pyu-r-int-thick-7-2491346.pdf?src-supplier=Digikey, ComponentLink3Description=https://datasheet.ciiva.com/2491/pyu-r-int-thick-7-2491347.pdf?src-supplier=Digikey, ComponentLink3URL=https://datasheet.ciiva.com/2491/pyu-r-int-thick-7-2491347.pdf?src-supplier=Digikey, ComponentLink4Description=https://datasheet.ciiva.com/15189/getdatasheetpartid-327788-15189514.pdf?src-supplier=Verical, ComponentLink4URL=https://datasheet.ciiva.com/15189/getdatasheetpartid-327788-15189514.pdf?src-supplier=Verical, Construction=Rectangular, Depth=0.5mm, Features="Moisture Resistant", Height=0.016inch, Item Type=Resistor, Lead Free=5697LeadFree, Length=1mm, Manufacturer Part Number=RC0402FR-0782KL, Military Standard=Not, Number of Terminations=2, Packaging="Tape and Reel", Power Rating=63mW, Pricing="1=0.1, 10=0.015, 50=0.0088, 100=0.0073, 500=0.00488, 1000=0.00417, 5000=0.00297 (USD)", Reach SVHC Compliant=Unknown, RoHS=Yes, RoHS Compliant=Yes, Series=RC, Stock=88699, Supplier=Digikey, Technology="THICK FILM", Termination=SMD/SMT, Tolerance=1%, Voltage Rating (AC)=50V, Width=0.02inch
U1: "IC LED DRVR RGLTR PWM TSOT23-6", Case/Package=SOT-23-6, Frequency=1MHz, LCSC Part Number=C36462, Manufacturer=Richtek, Max Operating Temperature=85°C, Max Supply Voltage=5.5V, Min Input Voltage=2.5V, Min Operating Temperature=-40°C, Output Current=20mA, Output Current per Channel=1.2A, Supplier Part Number=RT9293BGJ6-ND, Category="LED Drivers", ComponentLink1Description=https://datasheet.ciiva.com/28625/1782145-28625981.pdf?src-supplier=Element14, ComponentLink1URL=https://datasheet.ciiva.com/28625/1782145-28625981.pdf?src-supplier=Element14, ComponentLink2Description=https://datasheet.ciiva.com/18569/3d3futf-83fb3frfm5mjkzltaxlnbkzg3d3d3f3d-18569117.pdf?src-supplier=Digikey, ComponentLink2URL=https://datasheet.ciiva.com/18569/3d3futf-83fb3frfm5mjkzltaxlnbkzg3d3d3f3d-18569117.pdf?src-supplier=Digikey, Dimming=PWM, Item Type=IC, Lead Free="Lead Free", Manufacturer Part Number=RT9293BGJ6, Mounting Technology="Surface Mount", Number of Outputs=1, Packaging="Tape and Reel", Pins=23, Reach SVHC Compliant=Unknown, RoHS=Yes, RoHS Compliant=Yes, Series=-, Supplier=Digikey, Switching Frequency=1MHz, Topology=Boost

## Via types
v1: diameter 0.6, hole 0.3, Top Layer to Bottom Layer, 35 vias

## Nets (pads, with @x,y where several pads share a name; then routed paths per layer and width w, separated by ;. In a path a pad name is that pad's centre, name@x,y a point inside that pad or via, vN(x,y) a via of type N, cw(c..) or ccw(c..) an arc to the next point about the centre after c; other vN are vias at no path point)
BL_EN0_GPIO3_B0: D2.1 D2.10 J2.11 R1.2 | length 9.8
  Top Layer w0.254: R1.2 16.866,13.614 v1(17.526,12.954) ; D2.1 24.029,12.255 24.523,12.75 J2.11
  Bottom Layer w0.254: v1(17.526,12.954) 19.051,11.429 v1(22.645,11.429)
GND: C1.1 C2.1 C3.1 C4.1 C5.1 D2.3_8 J1.1 J1.2 J1.7 J1.9 J1.10 J1.13 J1.16 J1.19 J1.22 J1.25 J2.4 J2.15 J2.18 J2.21 J2.24 J2.27 J2.30 R2.1 R6.1 U1.2 | length 3.7
  Top Layer w0.254: C2.1 C2.1@13.273,6.833 ; v1(21.361,13.755) 21.861,13.255 D2.3_8
  Top Layer w0.3: v1(14.299,13.567) 14.323,13.591 15.176,13.591 R2.1 ; C3.1 22.511,9.786 23.488,9.786 v1(23.495,9.779)
  other v1: 8.306,4.521 23.419,4.851 13.259,5.74 19.101,10.236 8.119,23.697 9.385,23.697
LCD0_BL_PWM4: D2.2 D2.9 J2.12 R7.1 | length 6.9
  Top Layer w0.254: R7.1 19.852,12.242 19.852,12.903 20.056,13.106 21.361,13.106 21.712,12.755 D2.9 D2.2 23.99,12.755 24.485,13.25 J2.12
LCD0_RST_GPIO3_B5: D2.4 D2.7 J1.5 J2.13 | length 43.5
  Top Layer w0.254: J1.5 10.16,20.25 11.2,21.29 11.2,24.027 11.456,24.282 25.197,24.282 27.879,21.6 29.622,21.6 29.979,21.243 29.979,17.75 29.972,17.743 29.972,14.3 29.422,13.75 J2.13 25.626,13.753 23.303,13.753 D2.4 D2.7
LEDA: C1.2 D1.1 J1.27 U1.5
LEDK: J1.29 R3.2 R4.1 R6.2
MIPI_DSI_TX0_CLK_N: J1.18 J2.23 | length 28.7
  Top Layer w0.127: v1(3.864,13.637) 3.992,13.637 4.14,13.784 5.655,13.784 J1.18 ; v1(19.304,18.537) 19.432,18.537 19.58,18.39 22.34,18.39 22.666,18.716 25.595,18.716 J2.23
  Bottom Layer w0.127: v1(3.864,13.637) 3.736,13.637 3.589,13.784 3.195,13.784 2.819,14.16 2.819,15.333 3.565,16.078 9.601,16.078 11.913,18.39 19.028,18.39 19.176,18.537 v1(19.304,18.537)
MIPI_DSI_TX0_CLK_P: J1.17 J2.22 | length 28.7
  Top Layer w0.127: v1(3.864,14.363) 3.992,14.363 4.14,14.216 5.655,14.216 J1.17 ; v1(19.304,17.81) 19.432,17.81 19.58,17.958 22.519,17.958 22.845,18.284 25.595,18.284 J2.22
  Bottom Layer w0.127: v1(3.864,14.363) 3.736,14.363 3.589,14.216 3.374,14.216 3.251,14.339 3.251,15.154 3.743,15.646 9.78,15.646 12.091,17.958 14.507,17.958 14.951,17.958 cw(c14.951,17.767) 15.142,17.767 15.142,17.626 ccw(c15.332,17.626) 15.523,17.626 15.523,17.767 cw(c15.713,17.767) 15.904,17.767 15.904,17.626 ccw(c16.094,17.626) 16.285,17.626 16.285,17.767 cw(c16.475,17.767) 16.475,17.958 17.029,17.958 19.028,17.958 19.176,17.81 v1(19.304,17.81)
MIPI_DSI_TX0_D0_N: J1.24 J2.17 | length 38.9
  Top Layer w0.127: v1(2.235,10.262) 2.326,10.352 2.326,10.56 2.55,10.784 5.655,10.784 J1.24 ; J2.17 25.663,15.716 26.736,15.716 27.369,15.083 27.741,15.083 27.888,15.23 v1(28.016,15.23)
  Bottom Layer w0.127: v1(2.235,10.262) 2.145,10.171 1.937,10.171 1.754,9.988 1.754,8.685 1.828,8.611 11.176,8.611 17.648,15.083 18.734,15.083 19.398,15.083 ccw(c19.398,15.273) 19.588,15.273 19.588,15.41 cw(c19.779,15.41) 19.969,15.41 19.969,15.273 ccw(c20.16,15.273) 20.35,15.273 20.35,15.41 cw(c20.541,15.41) 20.731,15.41 20.731,15.273 ccw(c20.922,15.273) 20.922,15.083 21.366,15.083 27.741,15.083 27.888,15.23 v1(28.016,15.23)
MIPI_DSI_TX0_D0_P: J1.23 J2.16 | length 38.9
  Top Layer w0.127: v1(1.691,10.744) 1.782,10.834 1.989,10.834 2.371,11.216 5.655,11.216 J1.23 ; J2.16 25.663,15.284 26.557,15.284 27.19,14.651 27.741,14.651 27.888,14.503 v1(28.016,14.503)
  Bottom Layer w0.127: v1(1.691,10.744) 1.6,10.653 1.6,10.445 1.322,10.167 1.322,8.506 1.649,8.179 11.355,8.179 17.827,14.651 27.741,14.651 27.888,14.503 v1(28.016,14.503)
MIPI_DSI_TX0_D1_N: J1.21 J2.20 | length 30
  Top Layer w0.127: J1.21 5.706,12.267 10.635,12.267 11.18,12.813 11.365,12.813 v1(11.455,12.903) ; J2.20 25.663,17.216 26.771,17.216 27.555,16.432 28.059,16.432 28.25,16.623 28.25,16.832 v1(28.34,16.922)
  Bottom Layer w0.127: v1(11.455,12.903) 11.546,12.994 11.546,13.202 14.447,16.104 22.835,16.104 24.587,17.856 28.64,17.856 28.792,17.704 28.792,17.255 28.459,16.922 v1(28.34,16.922)
MIPI_DSI_TX0_D1_P: J1.20 J2.19 | length 31.5
  Top Layer w0.127: J1.20 5.706,12.733 10.442,12.733 10.851,13.142 10.851,13.327 v1(10.941,13.417) ; J2.19 25.663,16.784 26.592,16.784 27.376,16 28.237,16 28.555,16.318 28.764,16.318 v1(28.854,16.408)
  Bottom Layer w0.127: v1(10.941,13.417) 11.032,13.508 11.241,13.508 14.268,16.535 22.656,16.535 24.408,18.288 28.818,18.288 29.223,17.883 29.223,16.777 v1(28.854,16.408)
MIPI_DSI_TX0_D2_N: J1.15 J2.26 | length 31.7
  Top Layer w0.127: v1(1.245,15.697) 1.335,15.607 1.544,15.607 1.866,15.284 5.655,15.284 J1.15 ; v1(20.169,20.362) 20.297,20.362 20.445,20.215 22.668,20.215 22.67,20.216 25.595,20.216 J2.26
  Bottom Layer w0.127: v1(1.245,15.697) 1.245,16.86 2.19,17.805 8.585,17.805 11.003,20.223 16.861,20.223 16.869,20.215 19.894,20.215 20.041,20.362 v1(20.169,20.362)
MIPI_DSI_TX0_D2_P: J1.14 J2.25 | length 31.7
  Top Layer w0.127: v1(1.759,16.211) 1.849,16.121 1.849,15.912 2.045,15.716 5.655,15.716 J1.14 ; v1(20.169,19.635) 20.297,19.635 20.445,19.783 22.847,19.783 22.849,19.784 25.595,19.784 J2.25
  Bottom Layer w0.127: v1(1.759,16.211) 1.704,16.266 1.704,16.708 2.369,17.374 8.764,17.374 11.182,19.791 14.511,19.791 14.955,19.791 cw(c14.955,19.601) 15.146,19.601 15.146,19.434 ccw(c15.336,19.434) 15.527,19.434 15.527,19.601 cw(c15.717,19.601) 15.908,19.601 15.908,19.434 ccw(c16.098,19.434) 16.289,19.434 16.289,19.601 cw(c16.479,19.601) 16.479,19.791 16.649,19.791 16.658,19.783 17.053,19.783 19.894,19.783 20.041,19.635 v1(20.169,19.635)
MIPI_DSI_TX0_D3_N: J1.12 J2.29 | length 29.3
  Top Layer w0.127: v1(3.337,19.1) 3.337,18.972 3.485,18.824 3.485,17.48 4.18,16.784 5.655,16.784 J1.12 ; v1(22.708,22.377) 22.836,22.377 22.983,22.23 23.607,22.23 24.121,21.716 25.595,21.716 J2.29
  Bottom Layer w0.127: v1(3.337,19.1) 3.337,19.228 3.485,19.376 3.485,20.846 5.245,22.606 22.235,22.606 22.373,22.468 22.617,22.468 v1(22.708,22.377)
MIPI_DSI_TX0_D3_P: J1.11 J2.28 | length 28.9
  Top Layer w0.127: v1(4.064,19.1) 4.064,18.972 3.916,18.824 3.916,17.659 4.359,17.216 5.655,17.216 J1.11 ; v1(22.708,21.65) 22.836,21.65 22.983,21.798 23.428,21.798 23.942,21.284 25.595,21.284 J2.28
  Bottom Layer w0.127: v1(4.064,19.1) 4.064,19.228 3.916,19.376 3.916,20.667 5.424,22.174 14.496,22.174 14.94,22.174 cw(c14.94,21.984) 15.131,21.984 15.131,21.973 ccw(c15.321,21.973) 15.512,21.973 15.512,21.984 cw(c15.702,21.984) 15.893,21.984 15.893,21.973 ccw(c16.083,21.973) 16.274,21.973 16.274,21.984 cw(c16.464,21.984) 16.464,22.174 16.973,22.174 22.056,22.174 22.58,21.65 v1(22.708,21.65)
NetC3_2: C3.2 R5.1 R7.2
NetD1_2: D1.2 L1.2 U1.1
NetR1_1: R1.1 R2.2 U1.4
NetR3_1: R3.1 R4.2 R5.2 U1.3
VCC3V3_S: C4.2 C5.2 J1.3 J2.6 | length 41.7
  Top Layer w0.254: C4.2@9.361,21.184 C4.2@9.377,21.169
  Top Layer w0.3: C5.2@8.128,21.207 C5.2 ; C4.2@9.361,21.184 C4.2 9.388,21.212 10.16,21.212 10.643,21.694 10.643,24.257 11.2,24.814 25.503,24.814 28.067,22.25 29.979,22.25 30.607,21.622 30.607,10.643 30.214,10.25 J2.6
VCC5V0_SYS: C2.2 J2.1 J2.2 J2.3 L1.1 U1.6
  other v1: 24.3,7.9 14.58,7.976 15.517,7.976 24.3,8.56
pads on no net: D2.5 D2.6 J1.4 J1.6 J1.8 J1.26 J1.28 J1.30 J1.S1 J1.S2 J2.5 J2.7 J2.8 J2.9 J2.10 J2.14 J2.S1 J2.S2

## Polygon pours and split planes (outlines as drawn)
GND on Top Layer "GND_L02_P-001" (solid, pour order 0): 0.254,0.254 31.115,0.254 31.115,29.591 0.254,29.591
GND on Bottom Layer "GND_L02_P-001" (solid, pour order 1): 0.254,0.254 31.115,0.254 31.115,29.591 0.254,29.591 0.254,27.737

## Other copper
Top Layer:
  rectangle net GND: 7.861,4.19 8.754,6.052
  rectangle net NetR3_1: 19.809,6.459 20.238,11.525
  rectangle net BL_EN0_GPIO3_B0: 22.2,11.1 23.6,12.355
  rectangle net LCD0_BL_PWM4: 24.979,13.1 26.279,13.4
  rectangle net GND: 5.039,21.92 9.703,22.4
  rectangle net GND: 5.039,21.6 6.339,22.4
  rectangle net VCC3V3_S: 5.039,21.1 8.577,21.404
  rectangle net GND: 17.21,9.926 19.401,10.546
  region net GND: 23.852,5.175 22.963,5.175 22.963,3.38 23.852,3.38
  rectangle net VCC5V0_SYS: 23.825,7.595 26.279,8.9
  rectangle net LEDK: 6.858,1.702 21.813,2.388
  rectangle net LEDK: 6.858,2.159 7.518,8.401
  rectangle net LEDK: 5.039,8.1 7.518,8.401
  rectangle net LEDA: 5.039,9.1 10.135,9.4
  rectangle net NetD1_2: 17.785,3.018 19.535,4.618
  rectangle net NetD1_2: 18.685,3.018 19.533,9.596
  rectangle net NetD1_2: 17.21,8.484 19.536,9.596
  rectangle net BL_EN0_GPIO3_B0: 15.964,13.386 16.599,13.843
  rectangle net GND: 12.814,5.418 13.703,7.214
  rectangle net LEDA: 7.861,6.807 12.093,8.39
  rectangle net LEDA: 9.293,6.79 12.093,10.546
  rectangle net LEDA: 9.291,9.9 15.81,10.546
  rectangle net VCC5V0_SYS: 12.813,7.976 15.81,9.596
  rectangle net VCC5V0_SYS: 14.575,6.218 18.093,7.818
  rectangle net LEDK: 20.066,1.78 21.812,5.987
  rectangle net NetR3_1: 20.043,6.459 21.812,6.927
  rectangle net NetD1_2: 9.255,3.018 18.093,4.619
  rectangle net VCC5V0_SYS: 14.575,6.218 15.81,9.596
  rectangle net NetC3_2: 20.558,9.348 21.361,12.554
  rectangle net NetR3_1: 17.21,10.876 20.075,11.525
  region net GND: 9.877,21.919 9.877,24.027 7.681,24.027 7.681,21.919
  rectangle net NetR1_1: 14.59,12.441 16.599,13.106
  rectangle net NetR1_1: 14.59,10.876 15.81,13.106
  rectangle net VCC5V0_SYS: 24.979,7.6 26.279,8.9
  region net VCC3V3_S: 9.892,20.81 9.892,21.593 7.688,21.593 7.688,20.81
Bottom Layer:
  rectangle net VCC5V0_SYS: 14.122,7.59 24.841,8.898

## Silkscreen, mask and mechanical layers (free items; w line width, h text height)
Board Outline:
  circle w0.2: c28.821,2.5 r1.6
  circle w0.2: c2.5,27.311 r1.6
  circle w0.2: c2.489,2.489 r1.6
  circle w0.2: c28.821,27.311 r1.6
  lines w0.254: 0,0 31.321,0 31.321,29.811 0,29.811 0,0

## Text inside footprints (layer, text, board x,y; h text height)
J1: Top Overlay "1" at 3.916,22.38 h0.76 r270; Mechanical 13 "PCB Edge" at 0.417,21.23 h0.8 r270
J2: Top Overlay "1" at 27.401,7.62 h0.76 r90; Mechanical 13 "PCB Edge" at 30.901,8.77 h0.8 r90